# EAGLE board PortableAlarmWithDoubleFace (EAGLE 8.0.1)
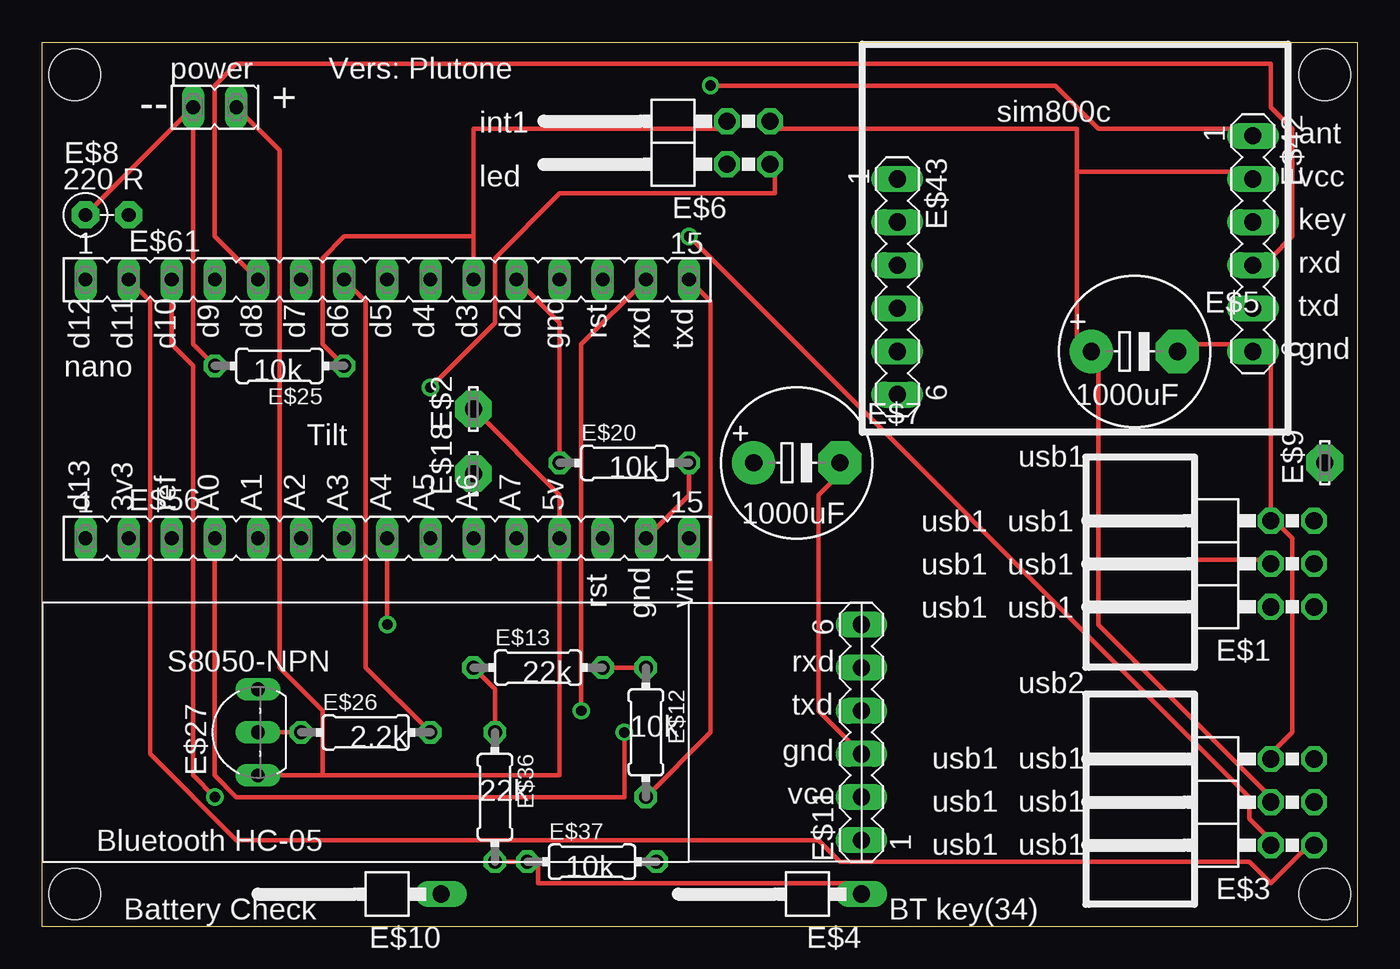
[diagram p0: board, top side]
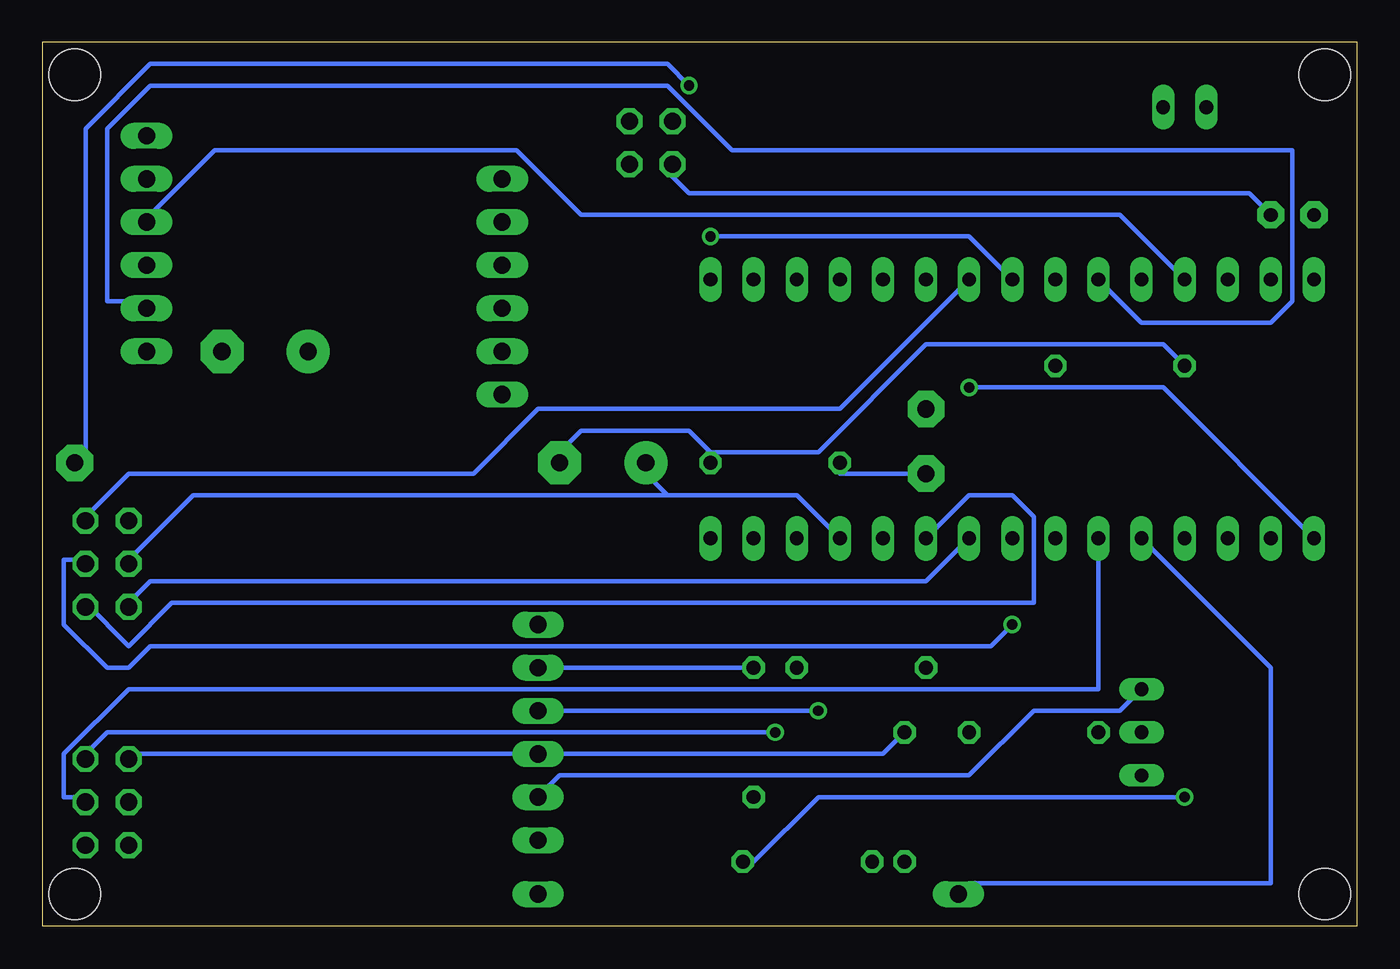
[diagram p1: board, bottom side, seen from below]

Size 77.47 x 52.07 mm. Coordinates in mm from the lower left corner, seen from the top.
Outline: 0,0 0,52.07 77.47,52.07 77.47,0 0,0
Copper layers (1*16): Top 0.035mm / dielectric 1.5mm / Bottom 0.035mm
Design rules "default": minimum track width 10mil, minimum drill 24mil, track to track 8mil, track to pad 8mil, pad to pad 8mil, via to via 8mil, smd to smd 8mil, copper to edge 40mil, drill to drill 8mil, minimum pad ring 10mil, minimum via ring 8mil, stop-mask expansion 4mil, vias tented up to drill 0mil, thermal gap 10mil
Holes 3 mm at 1.91,50.16 75.56,50.16 1.91,1.91 75.56,1.91

## Footprints (pad centres in the part's own frame; a part is rotated, then mirrored left to right if it is on the bottom)
2X03/90 = drill 1.016 octagon: 1 -2.54,-6.35; 2 -2.54,-3.81; 3 0,-6.35; 4 0,-3.81; 5 2.54,-6.35; 6 2.54,-3.81
LSP10 = drill 1.016 pad 2.159 octagon: MP 0,0
1X01/90 = drill 1.016 long: 1 -1.27,-3.81
E5-8,5 = drill 1.016 pad 2.54: + -2.54,0 | drill 1.016 pad 2.54 octagon: - 2.54,0
2X02/90 = drill 1.016 octagon: 1 -1.27,-6.35; 2 -1.27,-3.81; 3 1.27,-6.35; 4 1.27,-3.81
RS-2,5 = drill 0.813 pad 1.6 octagon: 1 -1.27,0; 2 1.27,0
MA06-1 = drill 1.016 long: 1 -6.35,0; 2 -3.81,0; 3 -1.27,0; 4 1.27,0; 5 3.81,0; 6 6.35,0
0204/7 = drill 0.813 octagon: 1 -3.81,0; 2 3.81,0
TO92- = drill 0.813 long: 1 2.54,0; 2 0,0; 3 -2.54,0
FE02-1 = drill 0.813 long: 1 -1.27,0; 2 1.27,0
FE15 = drill 0.813 long: 1 -17.78,0; 2 -15.24,0; 3 -12.7,0; 4 -10.16,0; 5 -7.62,0; 6 -5.08,0; 7 -2.54,0; 8 0,0; 9 2.54,0; 10 5.08,0; 11 7.62,0; 12 10.16,0; 13 12.7,0; 14 15.24,0; 15 17.78,0

## Placement (x,y rotation side)
E$1  [2X03/90]  68.58,21.36 90 top
E$2  [LSP10]  25.4,30.48 90 top
E$3  [2X03/90]  68.58,7.32 90 top
E$4  [1X01/90]  44.45,3.17 90 top
E$5  [E5-8,5]  64.35,33.87 0 top
E$6  [2X02/90]  36.53,46.16 90 top
E$7  [E5-8,5]  44.45,27.3 0 top
E$8  [RS-2,5]  3.81,41.91 0 top
E$9  [LSP10]  75.56,27.3 90 top
E$10  [1X01/90]  19.68,3.17 90 top
E$11  [MA06-1]  48.26,11.43 90 top
E$12  [0204/7]  35.56,11.43 270 top
E$13  [0204/7]  29.21,15.24 0 top
E$18  [LSP10]  25.4,26.67 90 top
E$20  [0204/7]  34.29,27.3 0 top
E$25  [0204/7]  13.97,33.02 180 top
E$26  [0204/7]  19.05,11.43 0 top
E$27  [TO92-]  12.7,11.43 90 top
E$36  [0204/7]  26.67,7.62 270 top
E$37  [0204/7]  32.38,3.81 0 top
E$42  [MA06-1]  71.33,40.22 270 top
E$43  [MA06-1]  50.38,37.68 270 top
E$44  [FE02-1]  10.16,48.26 0 top
E$56  [FE15]  20.32,22.86 0 top
E$61  [FE15]  20.32,38.1 0 top

## Library data of the parts
E$1 E$3 E$4 E$6 E$10 = pinhead
E$2 E$9 E$18 = solpad
E$5 E$7 = ref-packages-longpad
E$8 = discrete
E$11 E$42 E$43 = con-lstb
E$12 E$13 E$20 E$25 E$26 E$36 E$37 = eagle-ltspice
E$27 = transistor-fet
E$44 E$56 E$61 = con-lsta

## Nets
S$2: E$11.2 E$27.1
S$3: E$11.4 E$61.14
S$5: E$37.2 E$61.3
S$7: E$6.2 E$8.2
S$8: E$6.4 E$25.1 E$61.10
S$9: E$9.MP E$42.1
S$10: E$26.1 E$27.2
S$11: E$12.2 E$61.15
S$12: E$42.5 E$61.6
S$13: E$42.4 E$61.5
S$14: E$42.3 E$61.4
S$15: E$61.1
S$16: E$3.1 E$61.2
S$17: E$3.2 E$61.8
S$18: E$1.5 E$61.9
S$19: E$61.12
S$20: E$26.2 E$61.7
S$21: E$61.13
S$22: E$6.1 E$56.1
S$23: E$56.2
S$24: E$56.3
S$25: E$3.5 E$56.4
S$26: E$1.6 E$3.6 E$5.- E$7.- E$8.1 E$11.3 E$13.1 E$20.2 E$25.2 E$36.1 E$42.6 E$44.1 E$56.14
S$27: E$10.1 E$56.5
S$28: E$3.3 E$56.6
S$29: E$56.7
S$30: E$1.3 E$56.8
S$31: E$4.1 E$36.2 E$37.1
S$32: E$1.2 E$56.9
S$33: E$1.1 E$56.10
S$34: E$11.5 E$12.1 E$13.2
S$35: E$18.MP E$20.1 E$61.11
S$36: E$56.11
S$37: E$56.13
S$38: E$56.15
S$39: E$1.4 E$2.MP E$3.4 E$5.+ E$6.3 E$7.+ E$27.3 E$42.2 E$44.2 E$56.12

## Tracks (layer width: path | path; a pad name or v marks a point on that pad's centre or on a via)
S$2
  Bottom 0.254: E$27.1 13.97,12.7 19.05,12.7 22.86,8.89 46.99,8.89 E$11.2
S$3  (via drill 0.61)
  Top 0.254: E$61.14 31.75,34.29 v31.75,12.7
  Bottom 0.254: E$11.4 v31.75,12.7
S$5  (via drill 0.61)
  Top 0.254: v10.16,7.62 8.89,8.89 8.89,33.02 7.62,34.29 E$61.3
  Bottom 0.254: v10.16,7.62 31.75,7.62 35.56,3.81 E$37.2
S$7
  Bottom 0.254: E$8.2 6.35,43.18 39.37,43.18 40.64,44.45 E$6.2
S$8
  Top 0.254: E$25.1 16.51,34.29 16.51,39.37 17.78,40.64 25.4,40.64 | E$61.10 25.4,40.64 | 25.4,40.64 25.4,46.99 40.64,46.99 E$6.4
S$9  (via drill 0.61)
  Top 0.254: v39.37,49.53 59.69,49.53 62.23,46.99 71.12,46.99 E$42.1
  Bottom 0.254: v39.37,49.53 40.64,50.8 71.12,50.8 74.93,46.99 74.93,27.94 E$9.MP
S$10
  Top 0.254: E$26.1 E$27.2
S$11
  Top 0.254: E$12.2 39.37,11.43 39.37,36.83 E$61.15
S$12
  Bottom 0.254: E$61.6 12.7,35.56 5.08,35.56 3.81,36.83 3.81,45.72 36.83,45.72 40.64,49.53 71.12,49.53 73.66,46.99 73.66,36.83 72.39,36.83 E$42.5
S$13
  Top 0.254: E$61.5 10.16,40.64 10.16,49.53 11.43,50.8 72.39,50.8 72.39,48.26 73.66,46.99 73.66,40.64 72.39,39.37 E$42.4
S$14
  Bottom 0.254: E$61.4 13.97,41.91 45.72,41.91 49.53,45.72 67.31,45.72 71.12,41.91 E$42.3
S$16
  Top 0.254: E$61.2 6.35,36.83 6.35,10.16 11.43,5.08 45.72,5.08 46.99,3.81 71.12,3.81 72.39,2.54 74.93,5.08 E$3.1
S$17  (via drill 0.61)
  Top 0.254: v38.1,40.64 71.12,7.62 71.12,6.35 72.39,5.08 E$3.2
  Bottom 0.254: E$61.8 22.86,40.64 v38.1,40.64
S$18
  Bottom 0.254: E$61.9 30.48,30.48 48.26,30.48 52.07,26.67 72.39,26.67 74.93,24.13 E$1.5
S$20
  Top 0.254: E$26.2 19.05,15.24 19.05,36.83 E$61.7
S$22  (via drill 0.61)
  Top 0.254: v22.86,31.75 26.67,35.56 26.67,39.37 30.48,43.18 43.18,43.18 43.18,44.45 E$6.1
  Bottom 0.254: E$56.1 11.43,31.75 v22.86,31.75
S$25  (via drill 0.61)
  Top 0.254: E$56.4 10.16,8.89 11.43,7.62 34.29,7.62 v34.29,11.43
  Bottom 0.254: v34.29,11.43 73.66,11.43 74.93,10.16 E$3.5
S$26
  Top 0.254: E$8.1 E$44.1 8.89,34.29 E$25.2 | E$5.- 67.31,34.29 71.12,34.29 E$42.6 72.39,34.29 72.39,24.13 | E$56.14 38.1,25.4 E$20.2 | E$11.3 45.72,12.7 45.72,25.4 46.99,26.67 E$7.- | 72.39,24.13 73.66,22.86 73.66,11.43 72.39,10.16 E$3.6 | 72.39,24.13 E$1.6 | E$13.1 26.67,13.97 E$36.1
  Bottom 0.254: 38.1,27.94 39.37,29.21 45.72,29.21 46.99,27.94 E$7.- | E$3.6 72.39,10.16 E$11.3 27.94,10.16 E$36.1 | E$25.2 11.43,34.29 25.4,34.29 31.75,27.94 38.1,27.94 | 38.1,27.94 E$20.2
S$27
  Bottom 0.254: E$56.5 5.08,15.24 5.08,2.54 22.86,2.54 E$10.1
S$28
  Bottom 0.254: E$56.6 15.24,13.97 72.39,13.97 76.2,10.16 76.2,7.62 74.93,7.62 E$3.3
S$30  (via drill 0.61)
  Top 0.254: v20.32,17.78 E$56.8
  Bottom 0.254: v20.32,17.78 21.59,16.51 71.12,16.51 72.39,15.24 73.66,15.24 76.2,17.78 76.2,21.59 74.93,21.59 E$1.3
S$31
  Top 0.254: E$36.2 E$37.1 29.21,3.81 29.21,2.54 48.26,2.54 E$4.1
S$32
  Bottom 0.254: E$56.9 25.4,20.32 71.12,20.32 72.39,19.05 E$1.2
S$33
  Bottom 0.254: E$56.10 22.86,25.4 20.32,25.4 19.05,24.13 19.05,19.05 69.85,19.05 72.39,16.51 74.93,19.05 E$1.1
S$34
  Top 0.254: E$12.1 E$13.2
  Bottom 0.254: E$12.1 E$11.5
S$35
  Top 0.254: E$61.11 30.48,35.56 E$20.1
  Bottom 0.254: E$18.MP 30.48,26.67 E$20.1
S$39
  Top 0.254: 60.96,44.45 60.96,34.29 E$5.+ 62.23,33.02 62.23,21.59 | 60.96,44.45 60.96,46.99 43.18,46.99 E$6.3 | 60.96,44.45 71.12,44.45 E$42.2 | 62.23,21.59 62.23,17.78 72.39,7.62 E$3.4 | 62.23,21.59 72.39,21.59 E$1.4 | 16.51,8.89 30.48,8.89 E$56.12 30.48,25.4 E$2.MP | 16.51,8.89 E$27.3 | E$44.2 13.97,45.72 13.97,15.24 16.51,12.7 16.51,8.89
  Bottom 0.254: 40.64,25.4 41.91,26.67 E$7.+ | 40.64,25.4 33.02,25.4 E$56.12 | 40.64,25.4 68.58,25.4 72.39,21.59 E$1.4

## Text on the board
tPlace: power | + | Vers: Plutone | -- | int1 | sim800c | ant | 220 R | led | vcc | key | rxd | txd | d9 | d8 | d7 | d6 | d5 | d4 | d3 | d2 | rst | d12 | d11 | d10 | gnd | rxd | txd | gnd | nano | 10k | 1000uF | Tilt | usb1 | 10k | 1000uF | d13 | 3v3 | ref | A0 | A1 | A2 | A3 | A4 | A5 | A6 | A7 | 5v | usb1 | usb1 | usb1 | usb1 | rst | vin | gnd | usb1 | usb1 | S8050-NPN | rxd | 22k | usb2 | txd | 2.2k | 10k | gnd | usb1 | usb1 | vcc | 22k | usb1 | usb1 | Bluetooth HC-05 | usb1 | usb1 | 10k | Battery Check | BT key(34)